# Altium PCB OSP_Carrier_V8_ascii.PcbDoc (part 2 of 3)
Units mm, origin at the board's own origin, x right, y up, seen from the top; angles counter-clockwise.
Board outline 64.1 x 51.1 mm, 4 copper layers (Component Side, Signal Layer 1, Signal Layer 2, Solder Side), stack 1.58 mm thick; 182 components, 144 nets, 1232 pads, 422 vias.
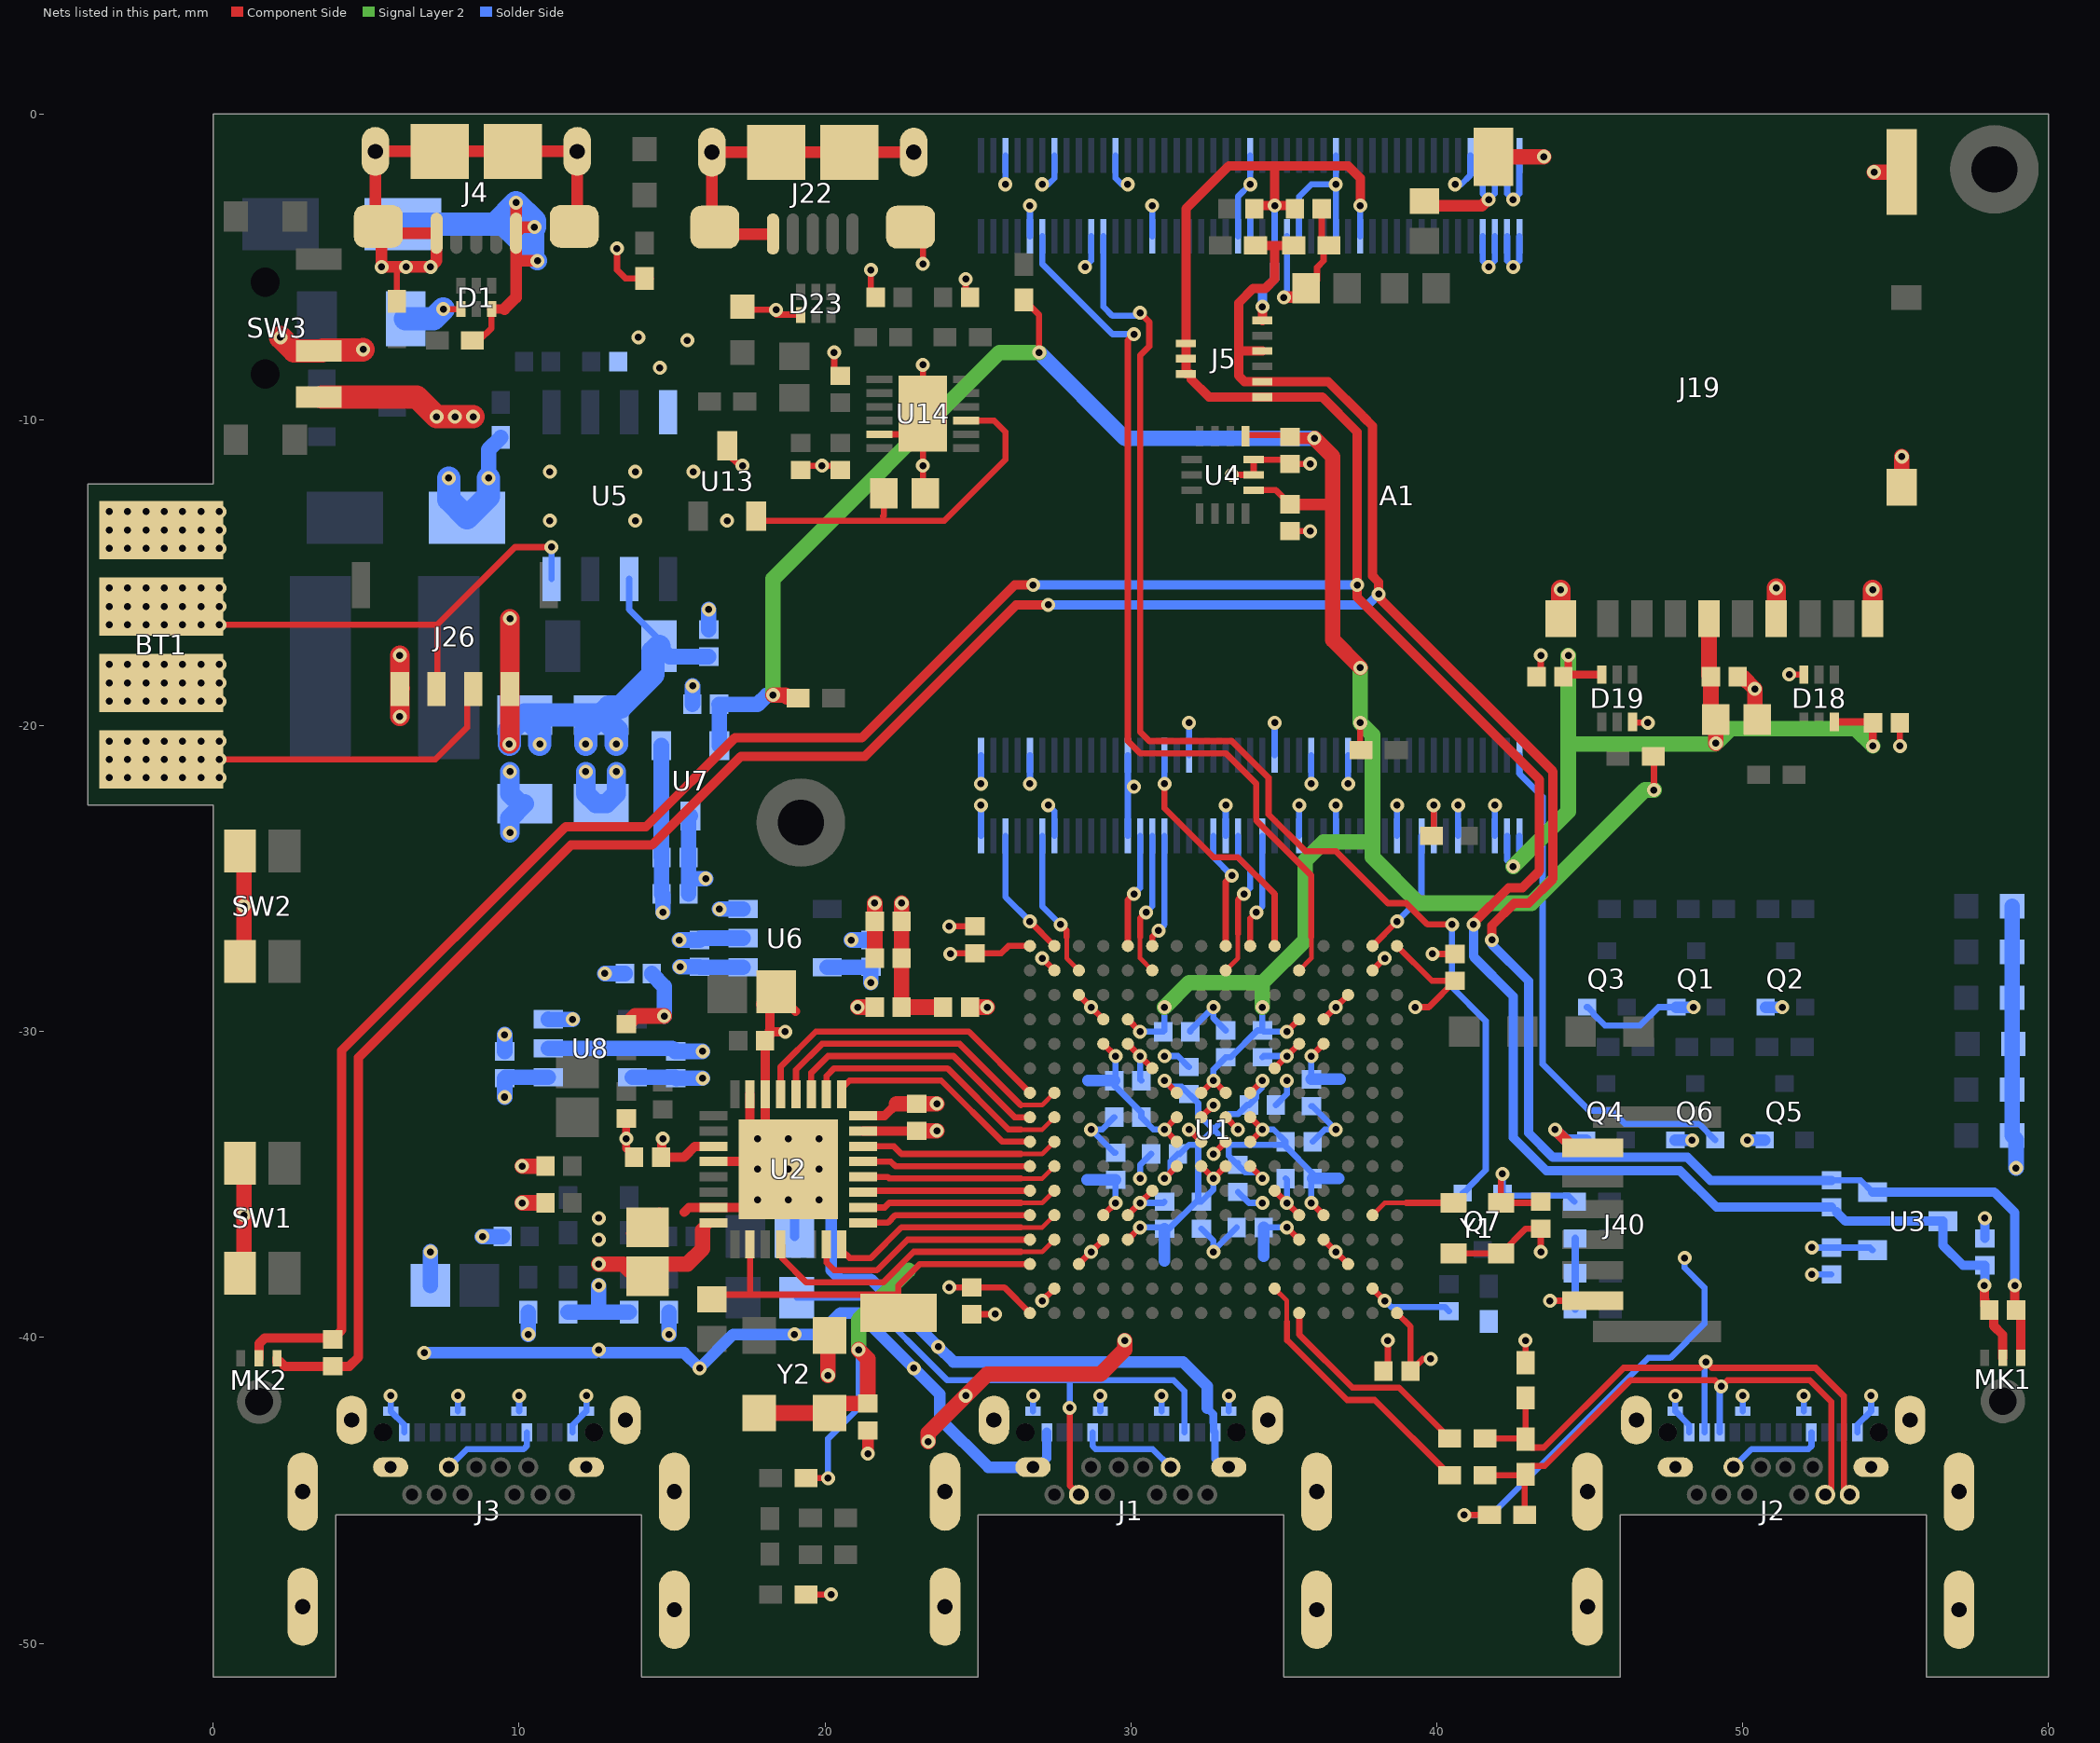
[diagram p3: the nets of this part, all layers, seen from the top]

## Part data
A1: "Variscite DART-SD410 System on Module"
BT1: library part SAMSUNG_BP2000, "Samsung BP2000 2000mAh battery for Galaxy Camera 2, connector AVX 9155-004-201-006"
C1 C60 C71: library part C1005X5R1A475K050BC, "CAP CER 4.7UF 10V X5R 0402"
C2 C24 C27 C29 C42 C43 C44 C50 C54 C55 C62 C63: library part GRM155R61A105KE15D, "CAP CER 1UF 10V X5R 0402"
C3 C4 C5 C6 C7 C12 C13 C14 C15 C16 C17 C18 C19 C20 C32 C33 C35 C36 C38 C39 C45 C53 C56 C59 C61 C64 C65 C72 C73: library part C1005X7R1H104K050BB, "CAP CER 0.1UF 50V X7R 0402"
C8 C9 C10 C11 C21 C22 C23 C25 C26 C28: library part CC0402KRX7R8BB103, "CAP CER 10000PF 25V X7R 0402"
C30 C40: library part C1005C0G1H150F050BA, "CAP CER 15PF 50V C0G 0402"
C31 C34 C37 C41: library part C2012X5R1A106M125AB, "CAP CER 10UF 10V X5R 0805"
C46 C51 C52: library part C1206C106M3RACTU, "CAP CER 10UF 25V X7R 1206"
C47 C48: library part C1005C0G1H330J050BA, "CAP CER 33PF 50V C0G 0402"
C49: library part GRM155R61A474KE15D, "CAP CER 0.47UF 10V X5R 0402"
C57 C74 C75: library part C1005C0G1H470G050BA, "CAP CER 47PF 50V C0G 0402"
C58 C70 C98 C99: library part C1608X7R1E105K080AB, "CAP CER 1UF 25V X7R 0603"
C107: library part C2012C0G1H102J060AA, "CAP CER 1000PF 50V C0G 0805"
D1 D23: library part TI_TPD4S012, "TI TPD4S012 USB ESD Protection"
D2 D3: library part B330A, "B330AE-13 Schottky Diode 3A 30V"
D18 D19: library part TI_TPD4E001, "TI TPD4E001 4-channel TVS ESD protection diodes"
FB1 FB2 FB4: library part CIM05U221NC, "FERRITE CHIP 220 OHM 500MA 0402"
FB3: library part CIS10P221NC, "FERRITE CHIP 220 OHM 2500MA 0603"
J0 J00: library part Dummy_Hirose_SoM_Connector, "Hirose DF40C-90DS-0.4V(51) Board-to-Board Connector"
J1 J2 J3: library part TE_USB_C_2129691-1, "TE 2129691-1 USB-C Socket"
J4 J22: library part 10118193-0001LF, "CONN USB MICRO B RECPT SMT R/A"
J5: library part HIROSE_FH58M-7S-0.25SHW-99, "Hirose FH58M-7S-0.25SHW(99) 7-pin Top+Bottom Contact FFC Connector"
J19: "CONN MICRO SD CARD PUSH-PUSH R/A"
J26: library part AMPHENOL_10125839-04RAEHLF_DNP, "Amphenol 10125839-04RAEHLF (Do Not Populate)"
J40: library part AMPHENOL_HFW6R-1STE1LF, "Amphenol HFW6R-1STE1LF 6-pin flat flexible cable connector"
L1: library part Laird_TYS60286R8M-10, "Laird TYS60286R8M-10 6.8uH 2.4A 47mOhms"
LD1 LD5: library part LTST-C191KRKT, "LED RED CLEAR 0603 SMD"
LD6 LD7 LD11: library part LTST-C191KGKT, "LED GREEN CLEAR 0603 SMD"
LD8 LD9: library part LTST-C191KSKT, "LED YELLOW CLEAR 0603 SMD"
LD10: library part LTST-C193TBKT-5A, "LED BLUE CLEAR 0603 SMD"
MK1 MK2: library part DBU_MIC_MEMS_MM023802-1, "DB Unlimited MM023802-1 Knowles-Style Bottom Port MEMS Microphone"
Q1 Q2 Q3 Q4 Q5 Q6 Q7: "MOSFET N-CH 30V 180MA SOT323"
Q8: library part NXP_PMV30XPEAR, "PMV30XPEAR PMOS 20V -5.3A 28mOhms"
R1 R12 R17 R18 R29: library part ERJ-2RKF2001X, "RES SMD 2K OHM 1% 1/10W 0402"
R3: library part ERJ-2RKF4701X, "RES SMD 4.7K OHM 1% 1/10W 0402"
R4 R7 R10 R11 R28 R31 R34 R40 R41 R44: library part ERJ-2RKF1002X, "RES SMD 10K OHM 1% 1/10W 0402"
R6 R15: library part CRCW06030000Z0EAHP, "RES SMD 0.0 OHM JUMPER 1/4W 0603"
R8: library part CSR1206FKR200, "RES SMD 0.2 OHM 1% 1/2W 1206"
R9: library part ERJ-2RKF2201X, "RES SMD 2.2K OHM 1% 1/10W 0402"
R13 R16 R19 R21: library part ERJ-2RKF1000X, "RES SMD 100 OHM 1% 1/10W 0402"
R14 R20: library part ERJ-2RKF1150X, "RES SMD 115 OHM 1% 1/10W 0402"
R22 R23 R24 R25 R26 R27: library part ERJ-2RKF2000X, "RES SMD 200 OHM 1% 1/10W 0402"
R30 R32: library part ERJ-2RKF1003X, "RES SMD 100K OHM 1% 1/10W 0402"
R33 R37 R38 R42: library part ERJ-2RKF1001X, "RES SMD 1K OHM 1% 1/10W 0402"
R35: library part ERJ-2RKF4702X, "RES SMD 47K OHM 1% 1/10W 0402"
R36 R39: library part ERJ-2RKF22R0X, "RES SMD 22 OHM 1% 1/10W 0402"
R47: library part ERJ-2RKF1004X, "RES SMD 1M OHM 1% 1/10W 0402"
R49: library part ERJ-2RKF4700X, "RES SMD 470 OHM 1% 1/10W 0402"
R54 R55: library part ERJ-2RKF33R0X, "RES SMD 33 OHM 1% 1/10W 0402"
R78: library part CRCW08050000Z0EAHP, "RES SMD 0.0 OHM JUMPER 1/2W 0805"
SW1 SW2: library part PANASONIC_EVQ-P7A01P, "Tact Switch SMT Right Angle"
TP1 TP2 TP3 TP4: "1mm Square SMD Test Point"
TP5: "Julian Extra-Large SMD Test Point"
U1: library part LCMXO3LF-6900C-XBG256X, "Lattice MachXO3LF-6900C-5BG256C FPGA"
U2: "Imported"
U3 U7 U13: "IC REG LDO 1.8V 0.15A SOT23-3"
U4: library part BOSCH_BMI160, "BMI160 2.5 x 3 mm Tiaxial Accelerometer / Gyroscope Inertial Measurement Unit"
U5: "Analog / Linear 1.5A Single Cell Li-Ion Battery Charger"
U6 U8: library part ROHM_BU33SD5WG, "ROHM BU33SD5WG-TR 3.3V 500mA LDO"
U14: library part FTDI_FT234XD, "FTDI FT234XD USB to UART"
Y1: library part MC_DSC1033DI2-012.2880, "Microchip 12.288 MHz SMD MEMS Oscillator"
Y2: library part ABRA_ASFLMB-1.544MHZ-LR-T, "Abracon ASFLMB-1.544MHZ-LR-T"

## Via types
v1: diameter 0.457, hole 0.229, Component Side to Solder Side, tented both sides, 422 vias

## Nets (pads, with @x,y where several pads share a name; then routed paths per layer and width w, separated by ;. In a path a pad name is that pad's centre, name@x,y a point inside that pad or via, vN(x,y) a via of type N, cw(c..) or ccw(c..) an arc to the next point about the centre after c; other vN are vias at no path point)
1V8_UART: C70.2 U13.3 U14.9 | length 12.1
  Component Side w0.203: U13.3@17.75,-13.15 17.9,-13.3 23.9,-13.3 25.9,-11.3 25.9,-10.4 25.525,-10.025 U14.9@24.615,-10.025 ; 21.9,-13.15 21.925,-13.125 C70.2@21.925,-12.4
+1V8_IO: C12.2 C18.1 C21.1 C23.1 C39.1 C62.1 R28.2 R31.2 R44.2 R47.2 U1.K8 U1.K9 U1.N5 U1.N12 U4.5 U4.8 U7.3 | length 84
  Component Side w0.203: R28.2@26.5,-6.075 27,-6.575 v1(27,-7.8) ; U1.N12@29.9,-29.6 v1(30.3,-30) ; U1.K9@32.3,-32 v1(32.7,-31.6) U1.K8@33.1,-32 ; U4.8@33.75,-10.537 33.788,-10.5 35.14,-10.5 C18.1@35.2,-10.56 C18.1@35.24,-10.6 ; U4.5@34.012,-12.3 34.74,-12.3 C39.1@35.2,-12.76 ; v1(35.1,-30) U1.N5@35.5,-29.6 ; v1(37.5,-19.9) 37.5,-20.775 R31.2@37.525,-20.8 ; R47.2@47.075,-21 47.1,-21.025 v1(47.1,-22.1)
  Component Side w0.381: C39.1@35.2,-12.76 36.56,-12.76 36.6,-12.8 ; C18.1@35.24,-10.6 v1(36,-10.6)
  Component Side w0.508: v1(18.3,-18.998) 18.708,-18.998 18.763,-19.054 19.079,-19.054 R44.2@19.125,-19.1 ; v1(36,-10.6) 36.6,-11.2 36.6,-12.8 36.6,-17.2 v1(37.5,-18.1)
  Signal Layer 2 w0.508: v1(18.3,-18.998) 18.3,-15.2 25.7,-7.8 v1(27,-7.8) ; v1(31.1,-29.2) 31.9,-28.4 34.3,-28.4 ; v1(34.3,-29.2) 34.3,-28.4 ; v1(37.5,-18.1) v1(37.5,-19.9) 37.9,-20.3 37.9,-23.8 ; v1(47.1,-22.1) 46.8,-22.1 43.1,-25.8 39.4,-25.8 37.9,-24.3 37.9,-23.8 ; 34.3,-28.4 35.7,-27 35.7,-24.4 36.3,-23.8 37.9,-23.8
  Solder Side w0.203: v1(30.3,-30) C21.1@31.06,-30 31.1,-29.96 v1(31.1,-29.2) ; v1(32.7,-31.6) 32.7,-31.24 C12.2@33.1,-30.84 33.26,-30.84 34.14,-29.96 C23.1@34.3,-29.96 ; v1(34.3,-29.2) C23.1@34.3,-29.96 ; v1(35.1,-30) 34.34,-30 C23.1@34.3,-29.96
  Solder Side w0.508: U7.3@16.55,-20.65 16.55,-19.31 C62.1@16.54,-19.3 17.8,-19.3 18.102,-18.998 v1(18.3,-18.998) ; v1(27,-7.8) 29.8,-10.6 v1(36,-10.6)
+1V8_MIC: C44.1 C64.2 C65.2 J5.3 J5.7 MK1.3 MK2.3 R40.2 R41.2 U3.3 | length 113.3
  Component Side w0.305: MK2.3@2.085,-40.685 2.085,-40.79 2.092,-40.798 2.198,-40.798 2.34,-40.94 C65.2@3.9,-40.94 4.45,-40.94 4.752,-40.638 4.752,-30.848 11.7,-23.9 14.35,-23.9 17.25,-21 21.3,-21 26.25,-16.05 v1(27.3,-16.05) ; R40.2@34.075,-4.3 34.7,-4.3 ; J5.3@34.3,-7.75 33.525,-7.75 ; R41.2@35.325,-4.3 34.7,-4.3 ; 37.575,-9.875 36.45,-8.75 J5.7@34.3,-8.75 33.715,-8.75 33.525,-8.56 33.525,-7.75 ; 37.6,-9.9 37.9,-10.2 37.9,-15.1 38.1,-15.3 v1(38.1,-15.7) 38.1,-15.741 38.176,-15.817 38.176,-15.876 43.8,-21.5 43.8,-25 43,-25.8 42.535,-25.8 41.8,-26.535 v1(41.8,-27) ; v1(58.9,-38.3) 58.9,-39.06 C64.2@58.94,-39.1 ; C64.2@58.94,-39.202 58.94,-39.222 59.092,-39.374 MK1.3@59.092,-40.665 ; 33.525,-7.75 33.525,-6.175 34,-5.7 34.4,-5.7 34.7,-5.4 34.7,-4.3
  Solder Side w0.203: C44.1@52.9,-34.86 53.86,-34.86 U3.3@54.25,-35.25
  Solder Side w0.305: v1(27.3,-16.05) 37.75,-16.05 v1(38.1,-15.7) ; v1(41.8,-27) 41.8,-27.15 43,-28.35 43,-33.315 43.797,-34.112 48.195,-34.112 48.944,-34.86 C44.1@52.9,-34.86 ; U3.3@54.25,-35.25 58.229,-35.25 58.9,-35.921 v1(58.9,-38.3)
+3V3_A: C27.1 C41.2 C63.1 R33.2 R38.2 U2.27 U2.32 U8.5 | length 13
  Component Side w0.203: C41.2@13.8,-37.6 C41.2@14.2,-38 14.6,-37.6 C41.2@14.7,-37.5
  Component Side w0.305: v1(14.7,-33.5) 14.671,-33.529 14.671,-34.069 C63.1@14.64,-34.1 15.4,-34.1 15.75,-33.75 U2.27@16.349,-33.75 ; 16,-36.5 16.25,-36.25 U2.32@16.349,-36.25
  Component Side w0.508: v1(12.6,-37.6) 13.4,-37.6 13.6,-37.8 C41.2@13.8,-37.6 ; C41.2@14.6,-37.6 15.5,-37.6 16,-37.1 16,-36.5
  Solder Side w0.508: R38.2@11.6,-39.175 12.6,-39.175 ; v1(12.6,-38.3) 12.6,-39.175 ; R33.2@13.6,-39.175 12.6,-39.175 ; U8.5@13.703,-31.495 15.098,-31.495 C27.1@15.128,-31.525 ; C27.1@15.141,-31.537 C27.1@15.128,-31.525 ; v1(16,-31.525) C27.1@15.128,-31.525
+3V3_D: C1.2 C2.1 C3.2 C42.1 C45.2 C55.1 FB1.1 R12.2 R18.2 U2.16 U6.5 Y2.1 Y2.4 | length 37.1
  Component Side w0.203: R18.2@19.375,-44.6 v1(20.1,-44.6) ; v1(40.9,-45.8) R12.2@41.725,-45.8
  Component Side w0.305: U2.16@21.251,-32.75 21.95,-32.75 22.34,-32.36
  Component Side w0.508: Y2.4@17.85,-42.47 Y2.1@20.15,-42.47 20.46,-42.16 C45.2@21.4,-42.16 21.4,-40.7 v1(21.1,-40.4) ; 22.34,-32.36 C42.1@23,-32.36 v1(23.66,-32.36) ; v1(22.506,-25.8) C1.2@22.506,-26.4 C2.1@22.506,-27.6 C3.2@22.506,-29.2 FB1.1@23.86,-29.2
  Signal Layer 2 w0.508: v1(21.1,-40.4) 21.1,-39.429 22.732,-37.798
  Solder Side w0.203: v1(20.1,-44.6) 20.1,-43.31 21.1,-42.31 v1(21.1,-40.4) ; v1(40.9,-45.8) 41.78,-45.8 46.912,-40.668 47.632,-40.668 48.75,-39.55 48.75,-38.37 48.1,-37.72 v1(48.1,-37.4)
  Solder Side w0.508: U6.5@20.075,-27.895 C55.1@21.49,-27.895 ; v1(21.5,-28.4) 21.5,-27.905 C55.1@21.49,-27.895 ; C55.1@21.5,-27.886 C55.1@21.49,-27.895
+3V3_F: C4.2 C5.2 C6.2 C7.2 C8.2 C9.2 C10.2 C11.2 C13.2 C15.2 C16.2 C17.2 C19.2 C20.2 C22.1 C25.1 C26.1 C28.1 FB1.2 J40.1 R3.2 R4.2 R7.2 R10.2 U1.A1 U1.A16 U1.D5 U1.D12 U1.E4 U1.E13 U1.G7 U1.G8 U1.G9 U1.G10 U1.H7 U1.H10 U1.J7 U1.J10 U1.K7 U1.K10 U1.M4 U1.M13 U1.T1 U1.T16 Y1.1 Y1.4 | length 61.6
  Component Side w0.203: v1(24.06,-38.36) C9.2@24.8,-38.36 25.86,-38.36 U1.A16@26.7,-39.2 ; v1(24.1,-27.46) 24.12,-27.44 C4.2@24.9,-27.44 25.76,-27.44 26,-27.2 U1.T16@26.7,-27.2 ; U1.E13@29.1,-36 v1(29.5,-35.6) ; U1.M13@29.1,-30.4 v1(29.5,-30.8) ; U1.D12@29.9,-36.8 v1(30.3,-36.4) ; v1(31.1,-34.8) U1.G10@31.5,-34.4 ; v1(31.1,-31.6) U1.K10@31.5,-32 ; U1.H10@31.5,-33.6 v1(31.1,-33.2) U1.J10@31.5,-32.8 ; U1.G9@32.3,-34.4 v1(32.7,-34.8) U1.G8@33.1,-34.4 ; U1.G7@33.9,-34.4 v1(34.3,-34.8) ; U1.H7@33.9,-33.6 v1(34.3,-33.2) U1.J7@33.9,-32.8 ; U1.K7@33.9,-32 v1(34.3,-31.6) ; v1(35.1,-36.4) U1.D5@35.5,-36.8 ; v1(35.9,-35.6) U1.E4@36.3,-36 ; v1(35.9,-30.8) U1.M4@36.3,-30.4 ; U1.A1@38.7,-39.2 39.14,-39.64 C5.2@39.14,-41.1 39.54,-40.7 v1(39.8,-40.7) ; U1.T1@38.7,-27.2 39.84,-28.34 C8.2@40.6,-28.34 39.74,-29.2 v1(39.3,-29.2) ; Y1.4@40.55,-37.25 Y1.1@42.1,-37.25 42.91,-36.44 C17.2@43.4,-36.44 v1(43.4,-37.2) ; v1(43.7,-38.8) J40.1@45.1,-38.8
  Component Side w0.508: FB1.2@24.74,-29.2 v1(25.3,-29.2)
  Solder Side w0.203: v1(29.5,-35.6) C28.1@29.5,-34.84 ; v1(29.5,-30.8) 29.5,-31.56 C26.1@29.46,-31.6 29.46,-31.76 30.34,-32.64 C16.2@30.34,-32.8 30.74,-33.2 v1(31.1,-33.2) ; v1(30.3,-36.4) 31.06,-36.4 C22.1@31.1,-36.44 31.26,-36.44 32.14,-35.56 C13.2@32.3,-35.56 ; v1(31.1,-34.8) 31.3,-34.6 31.3,-34.24 C7.2@31.54,-34 31.6,-34 31.9,-33.7 32.2,-33.7 ; v1(31.1,-31.6) 31.3,-31.8 31.66,-31.8 32.2,-32.34 32.2,-32.7 32.7,-33.2 ; v1(32.7,-34.8) 32.7,-35.16 C13.2@32.3,-35.56 ; C11.2@33.5,-34.3 C11.2@33.5,-34.36 ; v1(34.3,-34.8) 34.1,-34.6 33.74,-34.6 C11.2@33.5,-34.36 ; v1(34.3,-33.2) 34.66,-33.2 C20.2@35.06,-33.6 ; v1(34.3,-31.6) 34.3,-31.8 34.1,-32 34.1,-32.16 C6.2@33.86,-32.4 33.8,-32.4 33.5,-32.7 33.2,-32.7 32.7,-33.2 ; C25.1@34.34,-36.4 v1(35.1,-36.4) ; v1(35.9,-35.6) 35.9,-34.84 C15.2@35.94,-34.8 35.94,-34.64 C20.2@35.06,-33.76 ; C19.2@35.9,-31.56 v1(35.9,-30.8) ; 32.2,-33.7 32.7,-33.2 ; 32.2,-33.7 32.2,-35.46 C13.2@32.3,-35.56 ; 32.7,-33.2 33.2,-33.7 ; 33.2,-33.7 33.2,-34.06 C11.2@33.5,-34.36 ; 33.2,-33.7 34.96,-33.7 C20.2@35.06,-33.6 ; C20.2@35.06,-33.76 C20.2@35.06,-33.6 ; C20.2@35.06,-33.76 C20.2@35.06,-33.6
  Solder Side w0.254: R10.2@44.525,-39.075 R4.2@44.525,-37.9 R7.2@44.525,-36.76
  Solder Side w0.381: 28.56,-34.84 C28.1@29.5,-34.84 ; 28.6,-31.6 C26.1@29.46,-31.6 ; 31.1,-37.5 C22.1@31.1,-36.44 ; 34.34,-37.34 C25.1@34.34,-36.4 ; C19.2@35.9,-31.56 36.84,-31.56 ; C15.2@35.94,-34.8 36.8,-34.8
+3V7: A1.1 A1.2 A1.3 A1.4 A1.5 A1.6 A1.7 A1.8 C24.1 C43.1 C54.1 C60.2 C61.2 J1.A9 J1.B9 J2.A4 J2.B4 J3.A4 J3.B4 LD5.1 LD6.1 LD7.1 LD8.1 LD9.1 LD10.1 R6.2 SW3.3 U3.1 U6.1 U6.3 U7.1 U8.1 U8.3 | length 49.6
  Component Side w0.381: R6.2@39.6,-2.85 39.75,-3 41.479,-3 41.679,-2.8 v1(41.7,-2.8)
  Component Side w0.762: SW3.3@3.55,-9.25 6.65,-9.25 v1(7.3,-9.9) v1(7.9,-9.9) v1(8.5,-9.9)
  Solder Side w0.203: J3.B4@7.7,-44.24 8.29,-43.65 10.149,-43.65 10.25,-43.549 J3.A4@10.25,-43.1 ; J1.A9@28.75,-43.1 28.75,-43.549 28.851,-43.65 30.71,-43.65 J1.B9@31.3,-44.24 ; A1.7@41.5,-4 41.5,-4.8 v1(41.7,-5) 41.9,-4.8 A1.5@41.9,-4 ; A1.8@41.5,-1.36 41.5,-2.6 v1(41.7,-2.8) 41.9,-2.6 A1.6@41.9,-1.36 ; A1.3@42.3,-4 42.3,-4.8 v1(42.5,-5) 42.7,-4.8 A1.1@42.7,-4 ; A1.4@42.3,-1.36 42.3,-2.6 v1(42.5,-2.8) 42.7,-2.6 A1.2@42.7,-1.36 ; J2.B4@49.7,-44.24 50.29,-43.65 52.149,-43.65 52.25,-43.549 J2.A4@52.25,-43.1 ; v1(52.26,-37.06) C43.1@52.9,-37.06 54.16,-37.06 U3.1@54.25,-37.15
  Solder Side w0.508: v1(9.528,-32.14) C24.1@9.528,-31.525 9.558,-31.495 U8.1@10.953,-31.495 ; U8.3@10.953,-29.595 10.959,-29.6 v1(11.75,-29.6) ; U7.1@14.65,-20.65 14.65,-24.296 C61.2@14.66,-24.306 C60.2@14.66,-25.5 14.7,-25.54 v1(14.7,-26.1) ; v1(15.26,-27.886) C54.1@15.9,-27.886 15.91,-27.895 U6.1@17.325,-27.895 ; v1(16.55,-25.995) U6.3@17.325,-25.995 ; LD5.1@58.81,-25.9 LD9.1@58.81,-31.9 LD10.1@58.81,-33.4 58.94,-33.53 v1(58.94,-34.46)
+3V7_BATT: BT1.1 C50.1 C51.1 C52.1 J26.1 R1.2 R8.1 SW3.2 U5.6 | length 23.7
  Component Side w0.203: v1(13.2,-4.4) 13.2,-5.1 13.475,-5.375 R1.2@14.1,-5.375 R1.2@14.3,-5.375
  Component Side w0.635: v1(9.678,-20.6) 9.7,-20.578 J26.1@9.7,-18.8 v1(9.7,-16.5)
  Component Side w0.762: v1(2.2,-7.3) 2.65,-7.75 3.55,-7.75 3.581,-7.719 4.881,-7.719 v1(4.9,-7.7)
  Solder Side w0.203: U5.6@13.6,-15.2 13.6,-16.2 14.575,-17.175 R8.1@14.575,-17.4
  Solder Side w0.508: R8.1@14.575,-17.4 14.915,-17.74 C50.1@16.2,-17.74
  Solder Side w0.762: v1(9.678,-20.6) 9.678,-20.15 C52.1@10.178,-19.65 ; v1(10.678,-20.6) 10.678,-20.15 C52.1@10.178,-19.65 ; v1(12.178,-20.6) 12.178,-20.15 C51.1@12.678,-19.65 ; v1(13.178,-20.6) 13.178,-20.15 C51.1@12.678,-19.65 ; R8.1@14.575,-17.4 14.381,-17.594 14.381,-18.319 13.319,-19.381 12.947,-19.381 C51.1@12.678,-19.65 ; C52.1@10.178,-19.65 C51.1@12.678,-19.65
  other v1: -3.4,-14.2 -2.8,-14.2 -2.2,-14.2 -1.6,-14.2 -1,-14.2 -0.4,-14.2 0.2,-14.2 -3.4,-13.6 -2.8,-13.6 -2.2,-13.6 -1.6,-13.6 -1,-13.6 -0.4,-13.6 0.2,-13.6 -3.4,-13 -2.8,-13 -2.2,-13 -1.6,-13 -1,-13 -0.4,-13 0.2,-13
+5V_USB: D1.6 D2.1 J4.1 R30.2 | length 15.9
  Component Side w0.203: R30.2@8.475,-7.4 8.7,-7.4 9.1,-7 D1.6@9.1,-6.38
  Component Side w0.305: D1.6@9.1,-6.38 9.52,-6.38
  Component Side w0.381: 9.52,-6.38 9.9,-6 9.9,-4.8 ; v1(9.9,-2.9) J4.1@9.9,-3.9 ; v1(10.5,-3.7) 10.1,-3.7 J4.1@9.9,-3.9 ; v1(10.6,-4.8) 9.9,-4.8 ; 9.9,-4.8 J4.1@9.9,-3.9
  Solder Side w0.635: 9.4,-3.6 v1@10.5,-4.7 ; v1(10.5,-3.7) v1@10.5,-4.7 ; v1(10.6,-4.8) v1@10.5,-4.7
  Solder Side w0.762: D2.1@6.2,-3.6 9.2,-3.6 ; 9.2,-3.6 v1(9.9,-2.9) 10.5,-3.5 v1(10.5,-3.7) 10.4,-3.6 9.4,-3.6 9.2,-3.6
+V_SD: A1.101 A1.103 C56.2 C57.2 C58.2 C59.2 D18.6 D19.6 J19.4 | length 28.4
  Component Side w0.254: C59.2@44.14,-18.4 C59.2@44.215,-18.325 ; v1(44.3,-17.7) 44.3,-18.24 C59.2@44.215,-18.325 ; D19.6@45.4,-18.325 C59.2@44.215,-18.325 ; D18.6@53,-19.875 54.235,-19.875 C57.2@54.26,-19.9 v1(54.26,-20.66)
  Component Side w0.508: J19.4@48.9,-16.5 48.9,-18.34 C56.2@48.96,-18.4 48.96,-19.635 C58.2@49.125,-19.8 v1(49.125,-20.575)
  Signal Layer 2 w0.508: v1(42.5,-24.6) 44.3,-22.8 44.3,-20.6 ; v1(44.3,-17.7) 44.3,-20.6 ; v1(54.26,-20.66) 53.7,-20.1 49.6,-20.1 v1(49.125,-20.575) 49.1,-20.6 44.3,-20.6
  Solder Side w0.203: A1.103@42.3,-23.6 42.3,-24.4 v1(42.5,-24.6) 42.7,-24.4 A1.101@42.7,-23.6
ADC_CLK: R15.1 TP5.1 U1.C16 U2.2 | length 13.3
  Component Side w0.203: R15.1@16.3,-38.75 16.45,-38.6 17.525,-38.6 ; U2.2@17.55,-36.951 17.55,-38.575 17.525,-38.6 ; TP5.1@22.4,-39.2 TP5.1@22.4,-38.6 ; U1.C16@26.7,-37.6 23.1,-37.6 22.4,-38.3 TP5.1@22.4,-38.6 ; 17.525,-38.6 TP5.1@22.4,-38.6
ADC_D0: U1.D16 U2.7 | length 7.8
  Component Side w0.203: U2.7@20.05,-36.951 20.05,-37.55 20.3,-37.8 21.7,-37.8 22.7,-36.8 U1.D16@26.7,-36.8
ADC_D1: U1.E15 U2.8 | length 7.8
  Component Side w0.152: 26.4,-36.4 27.1,-36.4 U1.E15@27.5,-36
  Component Side w0.203: U2.8@20.55,-36.951 20.55,-37.15 20.8,-37.4 21.5,-37.4 22.5,-36.4 26.4,-36.4
ADC_D2: U1.E16 U2.9 | length 5.6
  Component Side w0.203: U2.9@21.251,-36.25 22.05,-36.25 22.3,-36 U1.E16@26.7,-36
ADC_D3: U1.F15 U2.10 | length 6.5
  Component Side w0.152: 26.4,-35.6 27.1,-35.6 U1.F15@27.5,-35.2
  Component Side w0.203: U2.10@21.251,-35.75 21.95,-35.75 22.1,-35.6 26.4,-35.6
ADC_D4: U1.F16 U2.11 | length 5.5
  Component Side w0.203: U2.11@21.251,-35.25 21.301,-35.2 U1.F16@26.7,-35.2
ADC_D5: U1.G15 U2.12 | length 6.4
  Component Side w0.152: 26.4,-34.8 27.1,-34.8 U1.G15@27.5,-34.4
  Component Side w0.203: U2.12@21.251,-34.75 22.05,-34.75 22.1,-34.8 26.4,-34.8
ADC_D6: U1.G16 U2.13 | length 5.5
  Component Side w0.203: U2.13@21.251,-34.25 22.15,-34.25 22.3,-34.4 U1.G16@26.7,-34.4
ADC_D7: U1.H15 U2.14 | length 6.5
  Component Side w0.152: 26.4,-34 27.1,-34 U1.H15@27.5,-33.6
  Component Side w0.203: U2.14@21.251,-33.75 22.25,-33.75 22.5,-34 26.4,-34
ADC_D8: U1.H16 U2.17 | length 7.3
  Component Side w0.203: U2.17@20.55,-32.049 20.55,-31.85 20.8,-31.6 23.8,-31.6 25.8,-33.6 U1.H16@26.7,-33.6
ADC_D9: U1.J15 U2.18 | length 9.1
  Component Side w0.152: 26.4,-33.2 27.1,-33.2 U1.J15@27.5,-32.8
  Component Side w0.203: U2.18@20.05,-32.049 20.05,-31.45 20.3,-31.2 24,-31.2 26,-33.2 26.4,-33.2
ADC_D10: U1.J16 U2.19 | length 8.9
  Component Side w0.203: U2.19@19.55,-32.049 19.55,-31.35 20.1,-30.8 24.2,-30.8 26.2,-32.8 U1.J16@26.7,-32.8
ADC_D11: U1.K15 U2.20 | length 10.6
  Component Side w0.152: 26.4,-32.4 27.1,-32.4 U1.K15@27.5,-32
  Component Side w0.203: U2.20@19.05,-32.049 19.05,-31.25 19.9,-30.4 24.4,-30.4 26.4,-32.4
ADC_OTR: U1.K16 U2.21 | length 10.4
  Component Side w0.203: U2.21@18.55,-32.049 18.55,-31.15 19.7,-30 24.7,-30 U1.K16@26.7,-32
ADC_PDWN: U1.D15 U2.4 | length 10.3
  Component Side w0.152: 26.4,-37.2 27.1,-37.2 U1.D15@27.5,-36.8
  Component Side w0.203: U2.4@18.55,-36.951 18.601,-37.002 18.601,-37.417 19.384,-38.2 21.9,-38.2 22.9,-37.2 26.4,-37.2
AGND: C27.2 C30.1 C31.1 C32.2 C33.2 C36.2 C37.1 C38.2 C40.1 C41.1 C63.2 C107.1 FB2.2 J1.A1 J1.A12 J1.B1 J1.B12 R37.1 R42.1 U2.22 U2.23 U2.28 U2.31 U2.33 U8.2 | length 75.6
  Component Side w0.203: C41.1@13.6,-36.6 13.8,-36.8 C41.1@14.2,-36.4 ; C32.2@18.04,-30.3 C32.2@18.05,-30.31
  Component Side w0.254: C36.2@13.5,-32.84 v1(13.5,-33.5) 13.5,-33.82 13.76,-34.08 C63.2@13.76,-34.1 ; C33.2@13.5,-29.76 C33.2@13.51,-29.75 ; U2.33@17.55,-35.75 v1(17.8,-35.5) v1(18.8,-34.5) U2.33@18.55,-34.25
  Component Side w0.305: 15.4,-35.9 15.55,-35.75 U2.31@16.349,-35.75 U2.33@17.55,-35.75 ; U2.28@16.349,-34.25 U2.33@18.55,-34.25 ; U2.33@17.55,-32.9 U2.23@17.55,-32.049 ; C32.2@18.04,-30.3 18.188,-30.152 18.188,-29.966 ; U2.33@18.05,-33.04 U2.22@18.05,-32.049 C32.2@18.05,-30.31 ; v1(18.7,-30) 18.221,-30 18.188,-29.966 ; C31.1@19.039,-29.339 18.948,-29.248 18.898,-29.248 18.4,-28.75 C31.1@18.4,-28.7 18.2,-28.9 18.2,-29.954 18.188,-29.966
  Component Side w0.508: v1(10.1,-35.6) C40.1@10.86,-35.6 ; v1(10.1,-34.4) C30.1@10.86,-34.4 ; C33.2@13.5,-29.76 13.52,-29.76 13.79,-29.49 v1(14.743,-29.49) ; C41.1@14.2,-36.4 C41.1@14.6,-36 ; C31.1@18,-29.1 C31.1@18.2,-28.9 ; C31.1@18.4,-28.7 C31.1@18.8,-29.1
  Solder Side w0.254: 32.5,-42.31 32.7,-42.51 32.7,-42.778 32.702,-42.78 32.702,-43.052 J1.A1@32.75,-43.1 32.75,-43.97 33.02,-44.24 J1.B12@33.2,-44.24
  Solder Side w0.305: C107.1@19,-36.7 19,-35.24 ; J1.B1@26.8,-44.24 26.957,-44.24 27.25,-43.947 J1.A12@27.25,-43.1
  Solder Side w0.381: v1(6.9,-40.5) 12.5,-40.5 v1(12.6,-40.4) 12.7,-40.5 15.4,-40.5 v1(15.9,-41) 17,-39.9 v1(19,-39.9) 19.8,-39.9 20.5,-39.2 21.1,-39.2 23.75,-41.85 23.75,-42.65 25.34,-44.24 J1.B1@26.8,-44.24 ; v1(19.8,-35.5) v1@19.9,-35.5 ; 20.2,-35.275 20.2,-37.8 20.5,-38.1 21.5,-38.1 v1(23.7,-40.3) 24.2,-40.8 31.7,-40.8 32.5,-41.6 32.5,-42.31
  Solder Side w0.508: C37.1@7.1,-38.3 v1(7.1,-37.2) ; v1(8.8,-36.7) C38.2@9.46,-36.7 ; v1(10.3,-39.9) R42.1@10.3,-39.175 ; U8.2@10.953,-30.545 15.008,-30.545 15.108,-30.645 C27.2@15.128,-30.645 v1(16,-30.645) ; FB2.2@14.34,-28.1 14.34,-28.12 14.743,-28.523 v1(14.743,-29.49) ; v1(14.9,-39.9) R37.1@14.9,-39.175
  other v1: 22.9,-41 12.6,-36.8 12.6,-36.1 18.8,-35.5 17.8,-34.5 19.8,-34.5 17.8,-33.5 18.8,-33.5 19.8,-33.5
BATT_ID: BT1.4 J26.2 | length 11.8
  Component Side w0.203: BT1.4@-1.7,-21.1 v1(-1.6,-21.1) v1(-1,-21.1) v1(-0.4,-21.1) v1(0.2,-21.1) 7.26,-21.1 8.3,-20.06 8.3,-19.367 8.302,-19.366 8.302,-18.998 J26.2@8.5,-18.8
  other v1: -3.4,-21.7 -2.8,-21.7 -2.2,-21.7 -1.6,-21.7 -1,-21.7 -0.4,-21.7 0.2,-21.7 -3.4,-21.1 -2.8,-21.1 -2.2,-21.1 -3.4,-20.5 -2.8,-20.5 -2.2,-20.5 -1.6,-20.5 -1,-20.5 -0.4,-20.5 0.2,-20.5
BATT_NTC: BT1.2 J26.3 U5.8 | length 19.1
  Component Side w0.203: v1(0.2,-16.1) v1(-0.4,-16.1) v1(-1,-16.1) v1(-1.6,-16.1) BT1.2@-1.7,-16.1 -1.1,-16.7 v1(-1,-16.7) v1(-0.4,-16.7) v1(0.2,-16.7) 7.325,-16.7 ; J26.3@7.3,-18.8 7.325,-18.775 7.325,-16.7 ; v1(11.06,-14.16) 9.865,-14.16 7.325,-16.7
  Solder Side w0.203: U5.8@11.06,-15.2 v1(11.06,-14.16)
  other v1: -3.4,-16.7 -2.8,-16.7 -2.2,-16.7 -1.6,-16.7 -3.4,-16.1 -2.8,-16.1 -2.2,-16.1 -3.4,-15.5 -2.8,-15.5 -2.2,-15.5 -1.6,-15.5 -1,-15.5 -0.4,-15.5 0.2,-15.5
BT_LED_CTRL: A1.102 Q6.1 | length 17.1
  Solder Side w0.203: A1.102@42.7,-20.96 42.7,-21.561 43.462,-22.323 43.462,-31.064 44.979,-32.581 45.719,-32.581 46.155,-33.017 47.392,-33.017 47.396,-33.013 48.572,-33.013 Q6.1@49.101,-33.542
CGND: A1.27 A1.41 A1.45 C44.2 C47.1 C48.1 C64.1 C65.1 FB4.1 J5.2 J5.4 J5.6 J5.S MK1.2 MK2.2 U3.2 | length 128.4
  Component Side w0.305: MK2.2@1.495,-40.685 1.495,-40.207 1.69,-40.012 3.968,-40.012 4.068,-39.912 4.068,-39.897 4.2,-39.765 4.2,-30.62 11.52,-23.3 14.15,-23.3 17.05,-20.4 21.2,-20.4 26,-15.6 26.2,-15.4 v1(26.8,-15.4) ; C47.1@34.04,-3.1 34.14,-3 v1(34.7,-3) ; J5.S@34.3,-6.75 v1(34.3,-6.3) ; C48.1@35.36,-3.1 35.26,-3 v1(34.7,-3) ; v1(37.5,-3) 37.5,-2.1 37.1,-1.7 34.7,-1.7 ; 38.5,-16.9 37.4,-15.8 v1(37.4,-15.4) 37.4,-10.4 36.25,-9.25 J5.S@34.3,-9.25 32.55,-9.25 31.973,-8.673 31.973,-8.527 31.945,-8.5 J5.6@31.8,-8.5 J5.4@31.8,-8 J5.2@31.8,-7.5 31.8,-3.1 33.2,-1.7 34.7,-1.7 ; 38.55,-16.95 43.36,-21.76 43.36,-24.74 42.8,-25.3 42.35,-25.3 41.2,-26.45 v1(41.2,-26.5) ; v1(57.9,-38.3) 57.9,-38.754 57.912,-38.766 57.912,-38.952 C64.1@58.06,-39.1 58.203,-39.243 58.203,-39.613 58.502,-39.912 MK1.2@58.502,-40.665 ; v1(34.7,-3) 34.7,-1.7
  Solder Side w0.203: A1.45@33.9,-4 33.9,-3.2 34.1,-3 v1(34.7,-3) A1.41@34.7,-4 34.7,-4.9 ; A1.27@37.5,-4 v1(37.5,-3)
  Solder Side w0.305: v1(26.8,-15.4) v1(37.4,-15.4) ; v1(34.3,-6.3) 34.3,-5.8 34.7,-5.4 34.7,-4.9 ; v1(41.2,-26.5) 41.2,-27.546 42.5,-28.846 42.5,-33.465 43.585,-34.55 47.95,-34.55 49.14,-35.74 C44.2@52.9,-35.74 ; C44.2@53.068,-35.888 53.068,-35.908 53.36,-36.2 U3.2@56.55,-36.2 56.55,-36.99 57.2,-37.64 FB4.1@57.912,-37.64 v1@57.912,-38.3
F_OSC: U1.E2 Y1.3 | length 2.8
  Component Side w0.152: U1.E2@37.9,-36 38.3,-35.6 39,-35.6
  Component Side w0.203: 39,-35.6 Y1.3@40.55,-35.6
FMBUS: J1.A3 J1.B3 R78.1 | length 19.2
  Component Side w0.203: v1(28,-42.3) 28,-44.84 J1.B3@28.3,-45.14
  Solder Side w0.203: R78.1@19.075,-38.7 21.3,-38.7 24,-41.4 28,-41.4 ; v1(28,-42.3) 28,-41.4 ; J1.A3@31.75,-43.1 31.75,-41.75 31.4,-41.4 28,-41.4
GND: A1.10 A1.31 A1.32 A1.37 A1.46 A1.47 A1.61 A1.68 A1.71 A1.78 A1.81 A1.86 A1.105 A1.111 A1.115 A1.121 A1.130 A1.131 A1.136 A1.137 A1.142 A1.149 A1.156 A1.165 A1.166 A1.177 A1.182 A1.189 A1.190 BT1.3 C1.1 C2.2 C3.1 C4.1 C5.1 C6.1 C7.1 C8.1 C9.1 C10.1 C11.1 C12.1 C13.1 C14.2 C15.1 C16.1 C17.1 C18.2 C19.1 C20.1 C21.2 C22.2 C23.2 C24.2 C25.2 C26.2 C28.2 C39.2 C42.2 C43.2 C45.1 C46.2 C50.2 C51.2 C52.2 C53.2 C54.2 C55.2 C56.1 C57.1 C58.1 C59.1 C60.1 C61.1 C62.2 C70.1 C71.1 C72.1 C73.1 C74.1 C75.1 D1.4 D3.1 D18.3 D19.3 D23.4 FB2.1 FB4.2 J1.S J2.A1 J2.A12 J2.B1 J2.B12 J2.S J3.A1 J3.A12 J3.B1 J3.B12 J3.S J4.5 J4.S J19.6 J19.9 J19.S J22.5 J22.S J26.4 J40.6 LD11.2 Q1.3 Q2.3 Q3.3 Q4.3 Q5.3 Q6.3 Q7.3 R9.2 R11.1 R17.1 R29.1 R34.1 R35.1 SW1.2 SW2.2 U1.B2 U1.B15 U1.C3 U1.C14 U1.D4 U1.D13 U1.E5 U1.E12 U1.F6 U1.F11 U1.H8 U1.H9 U1.J8 U1.J9 U1.L6 U1.L11 U1.M5 U1.M12 U1.N4 U1.N13 U1.P3 U1.P14 U1.R2 U1.R15 U2.15 U4.6 U4.7 U5.4 U6.2 U7.2 U13.2 U14.5 U14.13 Y1.2 Y2.2 | length 199.7
  Component Side w0.203: R35.1@6,-6.125 6,-5 ; v1(7.52,-6.38) D1.4@8.1,-6.38 ; U13.2@16.8,-10.85 16.8,-10.8 16.825,-10.825 16.825,-11.125 17.2,-11.5 v1(17.3,-11.5) ; LD11.2@17.3,-6.3 17.4,-6.4 v1(18.4,-6.4) 18.4,-6.56 19.08,-6.56 D23.4@19.2,-6.68 ; J22.5@18.3,-4.4 J22.5@18.3,-3.925 ; C71.1@19.2,-11.64 19.34,-11.5 v1(19.9,-11.5) 20.36,-11.5 C72.1@20.5,-11.64 ; R29.1@19.375,-48.4 v1(20.2,-48.4) ; v1(20.3,-7.8) 20.3,-8.36 C73.1@20.5,-8.56 ; v1(21.5,-5.1) 21.5,-5.84 C74.1@21.66,-6 ; U14.5@21.785,-10.475 22.525,-10.475 U14.13@23.2,-9.8 ; J22.S@22.8,-3.7 23.2,-4.1 v1(23.2,-4.9) ; C42.2@22.99,-33.25 C42.2@23,-33.24 ; v1(23.2,-8.2) U14.13@23.2,-9.8 ; C70.1@23.275,-12.4 23.2,-12.325 v1(23.2,-11.5) U14.13@23.2,-9.8 ; v1(24.06,-26.56) C4.1@24.9,-26.56 ; v1(24.6,-5.4) 24.6,-5.86 C75.1@24.74,-6 ; C9.1@24.8,-39.24 v1(25.56,-39.24) ; v1(27.1,-38.8) U1.B15@27.5,-38.4 ; v1(27.1,-27.6) U1.R15@27.5,-28 ; U1.C14@28.3,-37.6 v1(28.7,-37.2) U1.D13@29.1,-36.8 ; U1.P14@28.3,-28.8 v1(28.7,-29.2) U1.N13@29.1,-29.6 ; U1.E12@29.9,-36 v1(30.3,-35.6) U1.F11@30.7,-35.2 ; U1.M12@29.9,-30.4 v1(30.3,-30.8) U1.L11@30.7,-31.2 ; v1(31.9,-33.2) U1.H9@32.3,-33.6 ; U1.J9@32.3,-32.8 v1(32.7,-32.4) ; v1(32.7,-34) U1.H8@33.1,-33.6 ; U1.J8@33.1,-32.8 v1(33.5,-33.2) ; v1(33.3,-11.8) U4.6@34.012,-11.8 U4.7@34.012,-11.3 35.06,-11.3 C18.2@35.2,-11.44 v1(35.86,-11.44) ; U1.F6@34.7,-35.2 v1(35.1,-35.6) U1.E5@35.5,-36 ; U1.L6@34.7,-31.2 v1(35.1,-30.8) U1.M5@35.5,-30.4 ; C39.2@35.2,-13.64 v1(35.86,-13.64) ; U1.D4@36.3,-36.8 v1(36.7,-37.2) U1.C3@37.1,-37.6 ; U1.N4@36.3,-29.6 v1(36.7,-29.2) U1.P3@37.1,-28.8 ; U1.B2@37.9,-38.4 v1(38.3,-38.8) ; U1.R2@37.9,-28 v1(38.3,-27.6) ; C5.1@38.26,-41.1 38.4,-40.96 v1(38.4,-40.1) ; R34.1@39.825,-23.6 39.9,-23.525 v1(39.9,-22.6) ; v1(39.86,-27.46) C8.1@40.6,-27.46 ; v1(42.15,-34.649) 42.1,-34.699 Y1.2@42.1,-35.6 43.36,-35.6 C17.1@43.4,-35.56 ; R17.1@42.9,-40.825 v1(42.9,-40.1) ; C59.1@43.26,-18.4 43.4,-18.26 v1(43.4,-17.7) ; J40.6@44.471,-33.8 J40.6@45.1,-33.8 ; D19.3@46.4,-19.875 46.425,-19.9 v1(46.9,-19.9) ; v1(51.525,-18.325) D18.3@52,-18.325 ; v1(55.14,-20.66) C57.1@55.14,-19.9
  Component Side w0.305: U2.15@21.251,-33.25 C42.2@22.99,-33.25
  Component Side w0.381: J4.S@11.8,-3.675 11.9,-3.575 J4.S@11.9,-1.225 J4.S@9.8,-1.225 J4.S@7.4,-1.225 J4.S@5.3,-1.225 5.3,-3.575 J4.S@5.4,-3.675 J4.S@5.5,-3.775 ; J22.5@18.3,-3.925 16.625,-3.925 J22.S@16.4,-3.7 16.3,-3.6 J22.S@16.3,-1.25 J22.S@18.4,-1.25 J22.S@20.8,-1.25 J22.S@22.9,-1.25 ; v1(21.4,-43.8) C45.1@21.4,-43.04 ; v1(43.871,-33.2) J40.6@44.471,-33.8 ; J4.S@5.5,-3.775 v1(5.5,-5) 6,-5 v1(6.3,-5) v1(7.1,-5) 7.3,-4.8 J4.5@7.3,-3.9 5.625,-3.9 J4.S@5.5,-3.775
  Component Side w0.508: SW1.2@0.875,-37.9 1,-37.775 v1(1,-36) 1,-34.425 SW1.2@0.875,-34.3 ; SW2.2@0.875,-27.7 1,-27.575 v1(1,-25.9) 1,-24.225 SW2.2@0.875,-24.1 ; v1(20.1,-41.24) 20.1,-40.42 19.88,-40.2 Y2.2@20.15,-39.93 ; v1(21.069,-29.2) C3.1@21.626,-29.2 ; C2.2@21.626,-27.6 C1.1@21.626,-26.4 v1(21.626,-25.8) ; C42.2@23,-33.24 v1(23.66,-33.24) ; v1(23.375,-43.4) 23.375,-43.125 v1(24.6,-41.9) 25.3,-41.2 29,-41.2 29.8,-40.4 v1(29.8,-40.1) ; J19.S@41.85,-1.4 v1(43.5,-1.4) ; C56.1@49.84,-18.4 50,-18.4 v1(50.4,-18.8) 50.4,-19.725 C58.1@50.475,-19.8 ; v1(54.3,-1.9) J19.S@55.2,-1.9 ; J19.S@55.2,-12.2 v1(55.2,-11.2)
  Component Side w0.635: v1(6.1,-19.7) J26.4@6.1,-18.8 J26.4@6.117,-18.782 ; J26.4@6.1,-18.765 v1(6.1,-17.7) ; J19.S@44.05,-16.5 v1(44.05,-15.55) ; J19.6@51.1,-16.5 v1(51.1,-15.5) ; J19.9@54.25,-16.5 v1(54.25,-15.55)
  Solder Side w0.203: v1(5.8,-41.9) J3.S@5.8,-42.41 6.25,-42.86 J3.A12@6.25,-43.1 ; J3.S@8,-42.41 v1(8,-41.9) ; J3.S@10,-42.41 v1(10,-41.9) ; J3.A1@11.75,-43.1 11.75,-42.86 J3.S@12.2,-42.41 v1(12.2,-41.9) ; A1.189@25.1,-23.6 v1(25.1,-22.6) ; v1(25.1,-21.9) A1.190@25.1,-20.96 ; v1(25.9,-2.3) A1.86@25.9,-1.36 ; v1(26.7,-21.9) A1.182@26.7,-20.96 ; A1.81@26.7,-4 v1(26.7,-3) ; J1.S@26.8,-42.41 v1(26.8,-41.9) ; v1(27.1,-2.3) 27.3,-2.3 27.5,-2.1 A1.78@27.5,-1.36 ; v1(27.3,-22.6) 27.5,-22.8 A1.177@27.5,-23.6 ; v1(28.5,-5) 28.7,-4.8 A1.71@28.7,-4 ; J1.S@29,-42.41 v1(29,-41.9) ; C16.1@29.46,-32.8 29.06,-33.2 v1(28.7,-33.2) 29.46,-33.96 C28.2@29.5,-33.96 ; A1.68@29.5,-1.36 29.5,-2.1 29.7,-2.3 v1(29.9,-2.3) ; A1.165@29.9,-23.6 29.9,-22.2 ; A1.166@29.9,-20.96 29.9,-21.8 ; v1(30.3,-35.6) 31.06,-35.6 C22.2@31.1,-35.56 ; v1(30.3,-34.8) 30.3,-34.36 C7.1@30.66,-34 ; v1(30.3,-30.8) 30.3,-31.56 C26.2@30.34,-31.6 ; A1.61@30.7,-4 v1(30.7,-3) ; J1.S@31,-42.41 v1(31,-41.9) ; v1(31.1,-30.8) 31.54,-30.8 C10.1@31.9,-31.16 ; A1.156@31.9,-20.96 v1(31.9,-19.9) ; C21.2@31.94,-30 31.94,-29.96 v1(32.7,-29.2) 32.7,-29.56 C12.1@33.1,-29.96 ; C13.1@32.3,-36.44 32.7,-36.84 v1@32.7,-37.16 ; v1(32.7,-37.2) v1@32.7,-37.16 ; A1.149@33.1,-23.6 v1(33.1,-22.6) ; J1.S@33.2,-42.41 v1(33.2,-41.9) ; C25.2@33.46,-36.4 v1@32.7,-37.16 ; C11.1@33.5,-35.24 33.86,-35.6 v1(34.3,-35.6) ; A1.47@33.5,-4 33.5,-2.7 v1(33.9,-2.3) A1.46@33.9,-1.36 ; C23.2@34.3,-30.84 34.34,-30.8 v1(35.1,-30.8) ; A1.142@34.7,-20.96 v1(34.7,-19.9) ; C6.1@34.74,-32.4 35.1,-32.04 v1(35.1,-31.6) ; C15.1@35.06,-34.8 35.1,-34.84 v1(35.1,-35.6) ; A1.137@35.5,-23.6 v1(35.5,-22.6) ; A1.37@35.5,-4 35.5,-2.7 35.9,-2.3 v1(36.7,-2.3) ; C19.1@35.9,-32.44 35.94,-32.44 v1(36.7,-33.2) 36.34,-33.2 C20.1@35.94,-33.6 ; v1(35.9,-21.9) A1.136@35.9,-20.96 ; A1.131@36.7,-23.6 v1(36.7,-22.6) ; A1.31@36.7,-4 v1(36.7,-2.3) ; A1.32@36.7,-1.36 v1(36.7,-2.3) ; v1(37.1,-21.9) A1.130@37.1,-20.96 ; v1(38.3,-38.8) 38.5,-39 40.26,-39 C14.2@40.4,-39.14 ; A1.121@38.7,-23.6 v1(38.7,-22.6) ; A1.115@39.9,-23.6 v1(39.9,-22.6) ; v1(40.6,-2.3) 40.8,-2.3 41.1,-2 A1.10@41.1,-1.36 ; A1.111@40.7,-23.6 v1(40.7,-22.6) ; A1.105@41.9,-23.6 v1(41.9,-22.6) ; v1(42.15,-34.649) Q7.3@42.15,-35.275 42.237,-35.362 44.302,-35.362 R11.1@44.5,-35.56 ; Q3.3@44.9,-29.2 Q3.3@44.911,-29.2 44.936,-29.2 45.109,-29.373 45.109,-29.408 45.501,-29.8 46.65,-29.8 47.25,-29.2 Q1.3@47.83,-29.2 ; Q6.3@47.746,-33.597 Q6.3@47.801,-33.542 ; v1(47.8,-41.9) J2.S@47.8,-42.41 48.25,-42.86 J2.A12@48.25,-43.1 ; J2.S@50,-42.41 v1(50,-41.9) ; J2.S@52,-42.41 v1(52,-41.9) ; v1(52.26,-37.94) C43.2@52.9,-37.94 ; J2.A1@53.75,-43.1 53.75,-42.86 J2.S@54.2,-42.41 v1(54.2,-41.9) ; 29.9,-22.2 v1@29.9,-22 ; 29.9,-22.2 v1(30.1,-22) ; v1@29.9,-22 29.9,-21.8 ; v1@29.9,-22 v1(30.1,-22) ; 29.9,-21.8 v1(30.1,-22)
  Solder Side w0.305: FB4.2@57.912,-36.76 v1(57.912,-36.1)
  Solder Side w0.381: v1(43.871,-33.2) 44.217,-33.546 Q4.3@44.882,-33.546 ; Q6.3@47.801,-33.542 47.806,-33.547 48.345,-33.547 v1(48.349,-33.551) ; Q1.3@47.83,-29.2 v1(48.393,-29.2) ; v1(50.15,-33.551) 50.154,-33.547 50.716,-33.547 Q5.3@50.721,-33.542 ; Q2.3@50.75,-29.2 v1(51.296,-29.2)
  Solder Side w0.508: v1(9,-11.9) 9,-10.975 R9.2@9.4,-10.575 ; C24.2@9.528,-30.645 v1(9.528,-30.1) ; v1(12.8,-28.1) FB2.1@13.46,-28.1 ; v1(15.24,-27.006) C54.2@15.9,-27.006 15.96,-26.945 U6.2@17.325,-26.945 ; C60.1@15.54,-25.5 15.54,-25 ; U7.2@15.6,-22.95 15.54,-23.01 C61.1@15.54,-24.306 15.54,-25 ; C62.2@15.66,-19.3 15.671,-19.289 v1(15.671,-18.7) ; v1(16.1,-25) 15.54,-25 ; C50.2@16.2,-16.86 v1(16.2,-16.2) ; v1(20.86,-27.006) C55.2@21.5,-27.006
  Solder Side w0.635: v1(9.7,-23.5) 9.7,-23.028 C52.2@10.178,-22.55 10.033,-22.55 9.7,-22.217 v1(9.7,-21.5) ; v1(12.178,-21.5) 12.178,-22.217 12.511,-22.55 C51.2@12.678,-22.55 12.846,-22.55 13.178,-22.217 v1(13.178,-21.5)
  Solder Side w0.762: C46.2@6.29,-6.7 7.2,-6.7 v1(7.52,-6.38) ; v1(7.7,-11.9) 7.7,-12.6 D3.1@8.3,-13.2 9,-12.5 v1(9,-11.9)
  other v1: -3.4,-19.2 -2.8,-19.2 -2.2,-19.2 -1.6,-19.2 -1,-19.2 -0.4,-19.2 0.2,-19.2 -3.4,-18.6 -2.8,-18.6 -2.2,-18.6 -1.6,-18.6 -1,-18.6 -0.4,-18.6 0.2,-18.6 -3.4,-18 -2.8,-18 -2.2,-18 -1.6,-18 -1,-18 -0.4,-18 0.2,-18 11,-13.3 13.8,-13.3 16.8,-13.3 11,-11.7 13.8,-11.7 15.7,-11.7 14.6,-8.3 15.5,-7.4 13.9,-7.3
GPIO7: A1.79 U1.R5 | length 30
  Component Side w0.152: U1.R5@35.5,-28 35.9,-27.6 35.9,-26.9
  Component Side w0.203: v1(30.1,-7.2) 29.9,-7.4 29.9,-20.5 30.3,-20.9 33.1,-20.9 34.1,-21.9 34.1,-23.1 35.9,-24.9 35.9,-26.9
  Solder Side w0.203: A1.79@27.1,-4 27.1,-4.9 29.4,-7.2 v1(30.1,-7.2)
GPIO17: A1.69 Q7.1 | length 40.7
  Component Side w0.203: v1(30.3,-6.5) 30.6,-6.8 30.6,-7.6 30.3,-7.9 30.3,-20.2 30.6,-20.5 33.3,-20.5 34.5,-21.7 34.5,-22.9 35.7,-24.1 36.7,-24.1 38.4,-25.8 39,-25.8 39.7,-26.5 v1(40.5,-26.5)
  Solder Side w0.203: A1.69@29.1,-4 29.1,-6.3 29.4,-6.6 30.2,-6.6 v1(30.3,-6.5) ; v1(40.5,-26.5) 40.5,-28.552 41.6,-29.652 41.6,-34.525 41.048,-35.077 41.048,-35.102 40.875,-35.275 Q7.1@40.85,-35.275
GPIO31_CLK: A1.185 U1.T15 | length 4.3
  Component Side w0.203: v1(26.7,-26.4) U1.T15@27.5,-27.2
  Solder Side w0.203: A1.185@25.9,-23.6 25.9,-25.6 v1(26.7,-26.4)
GPIO62_INT: A1.160 U1.T6 | length 8.2
  Component Side w0.203: v1(31.1,-21.9) 31.1,-22.7 32.7,-24.3 33.5,-24.3 34.7,-25.5 U1.T6@34.7,-27.2
  Solder Side w0.203: v1(31.1,-21.9) A1.160@31.1,-20.96
I2S1_D0: A1.143 U1.T7 | length 3.8
  Component Side w0.203: U1.T7@33.9,-27.2 33.9,-26.3 v1(34.1,-26.1)
  Solder Side w0.203: v1(34.1,-26.1) 34.3,-25.9 A1.143@34.3,-23.6
I2S1_D1: A1.179 U1.R14 | length 4.9
  Component Side w0.152: 27.9,-26.9 27.9,-27.6 U1.R14@28.3,-28
  Component Side w0.203: v1(27.7,-26.5) 27.9,-26.7 27.9,-26.9
  Solder Side w0.203: A1.179@27.1,-23.6 27.1,-25.9 v1(27.7,-26.5)
I2S1_SCK: A1.147 U1.R8 | length 4.9
  Component Side w0.152: U1.R8@33.1,-28 33.5,-27.6 33.5,-26.8
  Component Side w0.203: 33.5,-26.8 33.5,-25.7 v1(33.7,-25.5)
  Solder Side w0.203: A1.147@33.5,-23.6 33.5,-24.3 33.9,-24.7 33.9,-25.3 v1(33.7,-25.5)
I2S1_WS: A1.151 U1.T8 | length 3.9
  Component Side w0.203: U1.T8@33.1,-27.2 33.1,-25.1 v1(33.3,-24.9)
  Solder Side w0.203: A1.151@32.7,-23.6 32.7,-24.3 v1(33.3,-24.9)
I2S2_D0: A1.159 U1.T11 | length 3.8
  Component Side w0.203: U1.T11@30.7,-27.2 30.7,-26.9 v1(30.9,-26.7)
  Solder Side w0.203: v1(30.9,-26.7) 31.1,-26.5 A1.159@31.1,-23.6
I2S2_D1: A1.117 U1.T2 | length 4.3
  Component Side w0.203: U1.T2@37.9,-27.2 v1(38.7,-26.4)
  Solder Side w0.203: v1(38.7,-26.4) 39.5,-25.6 A1.117@39.5,-23.6
I2S2_SCK: A1.163 U1.T12 | length 3.8
  Component Side w0.203: U1.T12@29.9,-27.2 29.9,-25.7 v1(30.1,-25.5)
  Solder Side w0.203: v1(30.1,-25.5) 30.3,-25.3 A1.163@30.3,-23.6
I2S2_WS: A1.161 U1.R11 | length 4.7
  Component Side w0.152: 30.3,-26.9 30.3,-27.6 U1.R11@30.7,-28
  Component Side w0.203: 30.3,-26.9 30.3,-26.3 v1(30.5,-26.1)
  Solder Side w0.203: v1(30.5,-26.1) 30.7,-25.9 A1.161@30.7,-23.6
L_LVDS_N: J2.A10 J2.B10 R12.1 R13.2 R14.2 | length 19.1
  Component Side w0.203: R13.2@41.575,-44.5 R14.2@42.875,-44.5 ; R12.1@42.875,-45.8 R14.2@42.875,-44.5 ; J2.B10@52.7,-45.14 52.9,-44.94 52.9,-42.1 52.2,-41.4 49.5,-41.4 v1(49.3,-41.6) 49.1,-41.4 46.329,-41.4 43.529,-44.2 43.175,-44.2 43.173,-44.202 43.098,-44.202 42.875,-44.425 R14.2@42.875,-44.5
  Solder Side w0.203: J2.A10@49.25,-43.1 49.25,-41.65 v1(49.3,-41.6)
L_LVDS_P: J2.A11 J2.B11 R14.1 R16.2 R17.2 | length 21.8
  Component Side w0.203: R16.2@41.575,-43.3 R14.1@42.875,-43.3 ; R17.2@42.875,-42 42.9,-42.025 R14.1@42.9,-43.325 R14.1@42.875,-43.3 ; 52.394,-40.994 53.306,-41.906 ; J2.B11@53.5,-45.14 53.306,-44.946 53.306,-41.906 ; R14.1@42.875,-43.3 42.875,-43.375 43.098,-43.598 43.173,-43.598 43.175,-43.6 43.5,-43.6 46.106,-40.994 48.606,-40.994 v1(48.8,-40.8) 48.994,-40.994 52.368,-40.994 53.281,-41.906 53.306,-41.906
  Solder Side w0.203: J2.A11@48.75,-43.1 48.75,-40.85 v1(48.8,-40.8)
L_PRE_N: R13.1 U1.B6 | length 9
  Component Side w0.152: U1.B6@34.7,-38.4 35.1,-38.8 35.1,-39.5
  Component Side w0.203: 35.1,-39.5 35.1,-40.1 35.125,-40.1 37.068,-42.042 37.967,-42.042 R13.1@40.425,-44.5
L_PRE_P: R16.1 U1.A5 | length 7.3
  Component Side w0.152: R16.1@40.2,-43.4 R16.1@40.425,-43.4
  Component Side w0.203: U1.A5@35.5,-39.2 35.506,-39.206 35.506,-39.906 37.236,-41.636 38.761,-41.636 R16.1@40.425,-43.3
MICL: A1.39 C48.2 C98.1 R41.1 | length 5.8
  Component Side w0.203: C98.1@35.825,-5.7 36.086,-5.439 36.086,-5.014 36.3,-4.8 R41.1@36.3,-4.3 ; C48.2@36.24,-3.1 36.24,-4.102 R41.1@36.438,-4.3 ; R41.1@36.362,-4.362 36.423,-4.3 R41.1@36.438,-4.3 ; R41.1@36.475,-4.3 R41.1@36.438,-4.3
  Component Side w0.381: v1(35,-6) 35.015,-5.985 35.615,-5.985 C98.1@35.7,-5.9
  Solder Side w0.203: v1(35,-6) 35.1,-5.9 A1.39@35.1,-4